# Altium PCB 400797.PcbDoc (part 4 of 8)
Units mm, origin at the board's own origin, x right, y up, seen from the top; angles counter-clockwise.
Board outline 155 x 63.5 mm, 4 copper layers (Top Layer, Mid-Layer 1, Mid-Layer 2, Bottom Layer), stack 1.514 mm thick; 317 components, 286 nets, 1519 pads, 2174 vias.
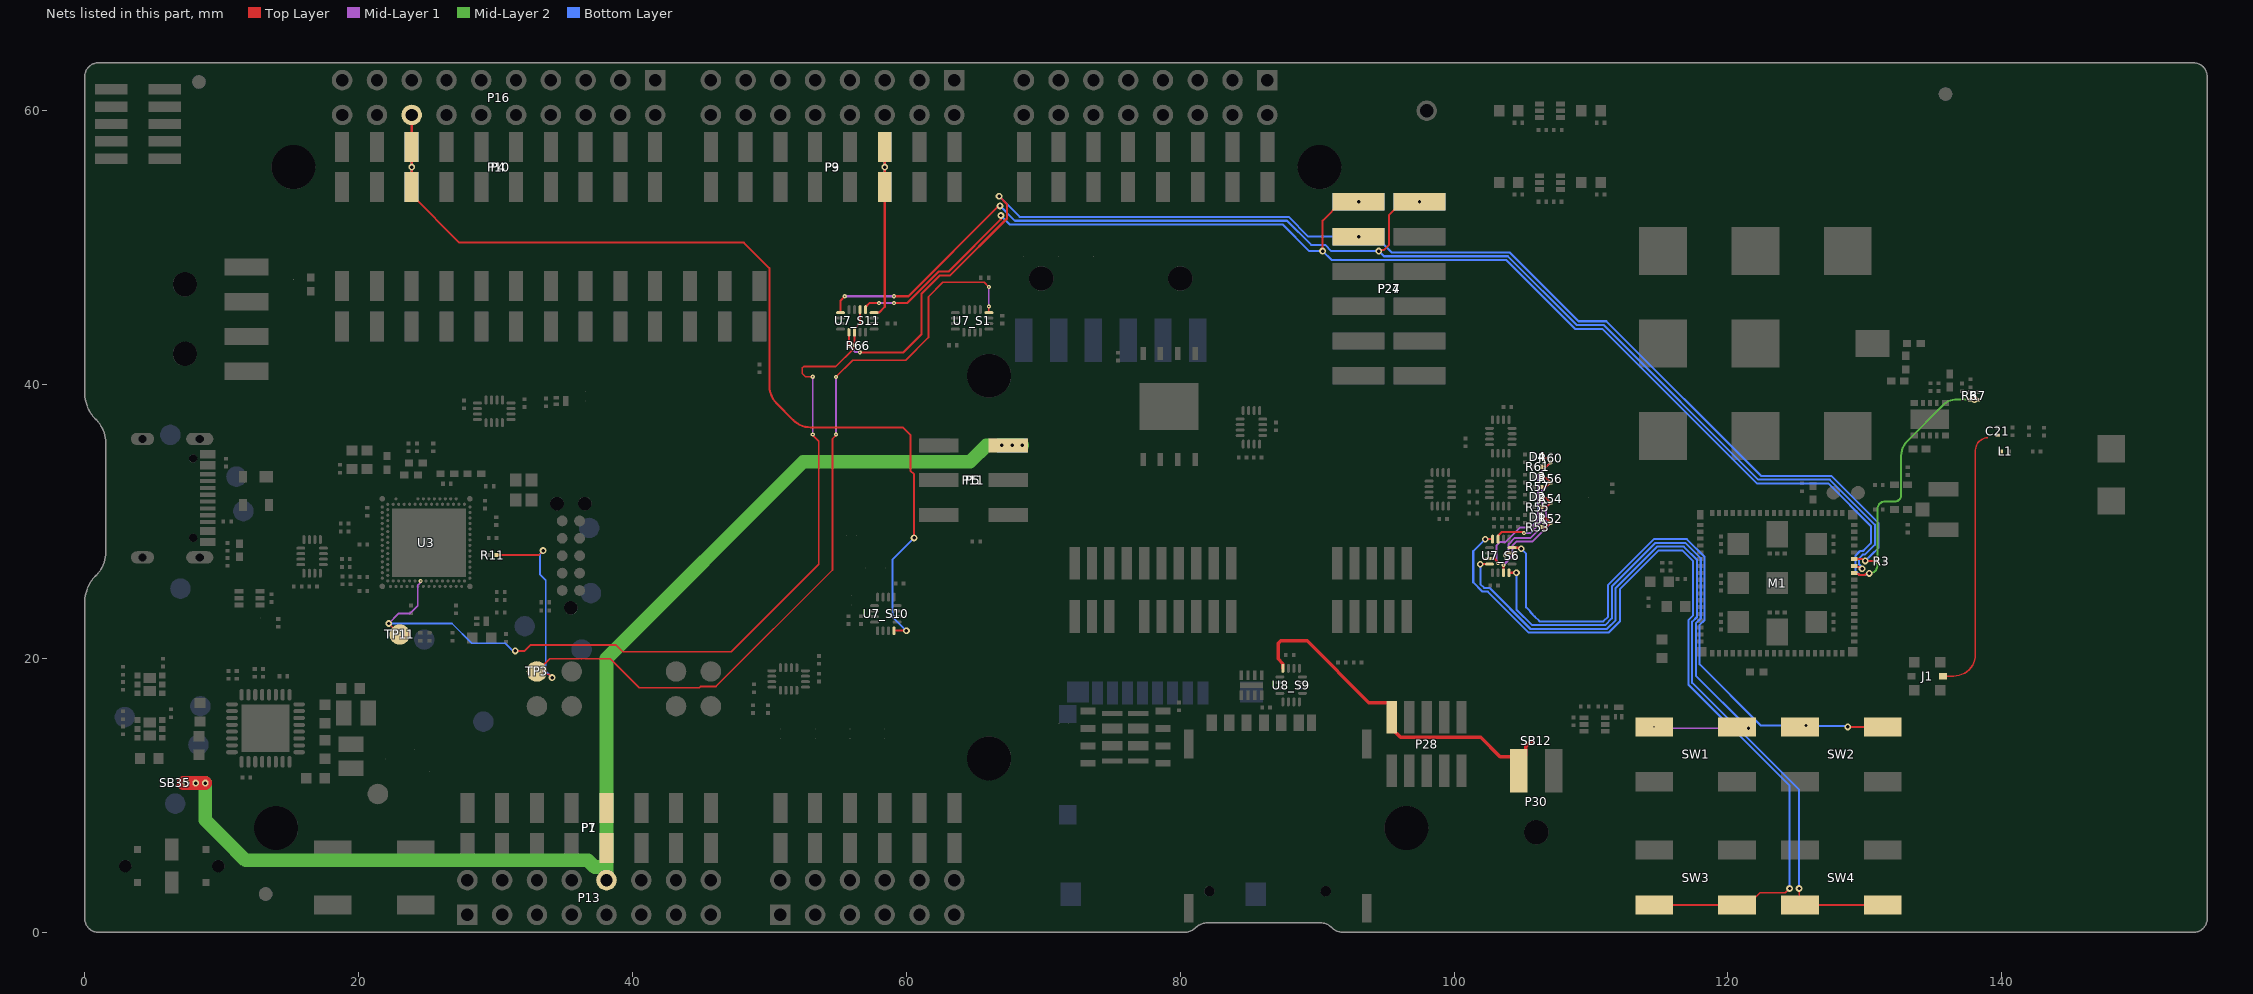
[diagram p4: the nets of this part, all layers, seen from the top]

## Via types
v1: diameter 0.5, hole 0.25, Top Layer to Bottom Layer, tented both sides, 1623 vias
v2: diameter 0.3, hole 0.1, Top Layer to Mid-Layer 1, tented top, 445 vias
v3: diameter 0.3, hole 0.1, Top Layer to Mid-Layer 1, tented both sides, 97 vias
v4: diameter 0.61, hole 0.305, Top Layer to Bottom Layer, tented both sides, 9 vias

## Nets (pads, with @x,y where several pads share a name; then routed paths per layer and width w, separated by ;. In a path a pad name is that pad's centre, name@x,y a point inside that pad or via, vN(x,y) a via of type N, cw(c..) or ccw(c..) an arc to the next point about the centre after c; other vN are vias at no path point) (continued)
COEX0: (continued)
  Bottom Layer w0.15: v1(66.9,52.35) 67.559,51.691 87.495,51.691 89.436,49.75 v1(90.4,49.75) 91.054,49.096 103.808,49.096 108.829,44.075 110.814,44.075 122.106,32.783 127.32,32.783 130.45,29.653 130.45,28.487 cw(c130.3,28.487) 130.406,28.381 129.919,27.894 cw(c129.813,28) 129.813,27.85 129.712,27.85 ccw(c129.712,27.7) 129.606,27.806 129.348,27.548 ccw(c129.455,27.443) 129.305,27.443 129.305,26.401 129.609,26.097 130.112,26.097 130.23,26.214 v1(130.324,26.214)
  other v1: 93.028,53.341
COEX1: M1.53 P24.2 P27.2 U7_S11.5 | length 99.2
  Top Layer w0.15: U7_S11.5@55.193,45.25 55.193,46.143 v2(55.5,46.45) ; v2(59.1,46.45) 60.154,46.45 66.754,53.05 v1(66.836,53.05) ; v1(94.5,49.75) 94.567,49.817 94.866,49.817 95.254,50.205 95.254,52.393 96.203,53.341 v1(97.473,53.341) ; M1.53@129.225,26.75 129.3,26.75 129.375,26.675 129.572,26.675 129.7,26.547 v1(129.795,26.547)
  Mid-Layer 1 w0.15: v2(55.5,46.45) v2(59.1,46.45)
  Bottom Layer w0.15: v1(66.836,53.05) 67.92,51.966 87.798,51.966 89.564,50.2 90.586,50.2 91.036,49.75 v1(94.5,49.75) 94.513,49.75 94.513,49.737 94.879,49.371 103.922,49.371 108.943,44.35 110.928,44.35 122.22,33.058 127.434,33.058 130.725,29.767 130.725,28.3 130,27.575 129.842,27.575 129.58,27.312 129.58,26.857 129.795,26.641 v1(129.795,26.547)
COEX2: M1.54 P24.3 P27.3 R3.2 U7_S11.9 | length 99.4
  Top Layer w0.15: v2(55.805,42.825) 55.812,42.832 55.812,43.819 U7_S11.9@55.818,43.825 ; v2(56.6,42.363) 56.613,42.35 59.793,42.35 61.1,43.657 61.1,46.618 62.457,47.975 63.194,47.975 67.35,52.131 67.35,53.173 v1(66.773,53.75) ; M1.54@129.225,27.25 129.811,27.25 129.935,27.126 v1(130.03,27.126) 130.043,27.113 130.902,27.113 R3.2@130.915,27.1
  Mid-Layer 1 w0.15: v2(55.805,42.825) 56.239,42.391 56.571,42.391 v2(56.6,42.363)
  Bottom Layer w0.15: v1(66.773,53.75) 68.281,52.242 87.911,52.242 89.352,50.801 v1(93.028,50.801) 94.298,50.801 95.452,49.646 104.063,49.646 109.084,44.625 111.119,44.625 122.411,33.333 127.547,33.333 131,29.881 131,28.096 130.419,27.515 v1(130.03,27.126)
COEX_SELECT: R66.2 TP11.1 U3.AK14 U7_S11.2 U7_S11.10 | length 63.5
  Top Layer w0.125: v1(22.2,22.55) TP11.1@23,21.75 ; v1(31.436,20.55) 32.134,20.55 32.571,20.988 38.78,20.988 39.28,20.488 47.216,20.488 53.6,26.871 53.6,35.86 53.162,36.298 v2(53.162,36.35) ; v2(53.162,40.575) 52.63,40.575 52.4,40.805 52.4,41.225 52.5,41.325 54.85,41.325 56.145,42.62 56.145,42.777 56.218,42.85 U7_S11.10@56.218,43.825 56.218,44.068 56.618,44.468 U7_S11.2@56.618,45.475
  Mid-Layer 1 w0.125: v1(22.2,22.55) 22.937,23.288 23.769,23.288 24.325,23.843 24.325,25.347 v2@24.525,25.547 ; v2@24.49,25.582 24.525,25.617 v2(24.525,25.659) ; v2(53.162,36.35) v2(53.162,40.575)
  Bottom Layer w0.125: v1(22.2,22.55) 26.819,22.55 28.269,21.1 30.7,21.1 31.25,20.55 v1(31.436,20.55)
COM.CH1_S1: R11.2 TP3.1 U7_S1.16 | length 73
  Top Layer w0.125: R11.2@30.06,27.55 33.175,27.55 33.475,27.85 v1(33.475,27.875) ; v1(34.125,18.6) 33.875,18.85 33.22,18.85 TP3.1@33.02,19.05 33.958,19.988 38.366,19.988 40.491,17.863 44.887,17.863 44.973,17.948 46.09,17.948 54.6,26.457 54.6,36.035 54.863,36.298 v2(54.863,36.35) ; v2(54.863,40.55) 54.863,40.565 56.073,41.775 59.943,41.775 61.612,43.445 61.612,46.406 62.669,47.463 65.688,47.463 v2(66.025,47.125) ; U7_S1.16@66.025,45.25 v2(66.025,45.7)
  Mid-Layer 1 w0.125: v2(54.863,36.35) v2(54.863,40.55) v2@54.863,40.575 ; v2(66.025,45.7) v2(66.025,47.125)
  Bottom Layer w0.125: v1(33.475,27.875) 33.25,27.65 33.25,26.117 33.663,25.704 33.663,19.063 v1(34.125,18.6)
COM.CH1_S9: P28.2 P30.1 SB12.2 U8_S9.16 | length 26.5
  Top Layer w0.254: U8_S9.16@87.5,19.275 87.498,19.277 87.498,19.615 87.148,19.965 87.148,21.093 87.342,21.287 89.266,21.287 93.778,16.775 95.46,16.775 P28.2@95.46,15.7 95.46,14.865 96.088,14.237 101.942,14.237 103.353,12.825 104.73,12.825 P30.1@104.73,11.8 ; P30.1@105.237,12.928 105.237,13.549 105.688,14
COM.CH1_S11: P3.3 P9.3 U7_S11.16 | length 16.1
  Top Layer w0.15: U7_S11.16@57.643,45.25 58,45.25 58.42,45.67 P3.3@58.42,54.416 P3.3@58.42,57.346
  Bottom Layer w0.15: P9.3@58.42,53.824 P9.3@58.42,54.416 v1(58.42,55.881) P9.3@58.42,57.346